# Altium PCB boost_converter.PcbDoc
Units mm, origin at the board's own origin, x right, y up, seen from the top; angles counter-clockwise.
Board outline 30.6 x 39.27 mm, 2 copper layers (Top Layer, Bottom Layer), stack 1.6 mm thick; 27 components, 16 nets, 72 pads, 24 vias.
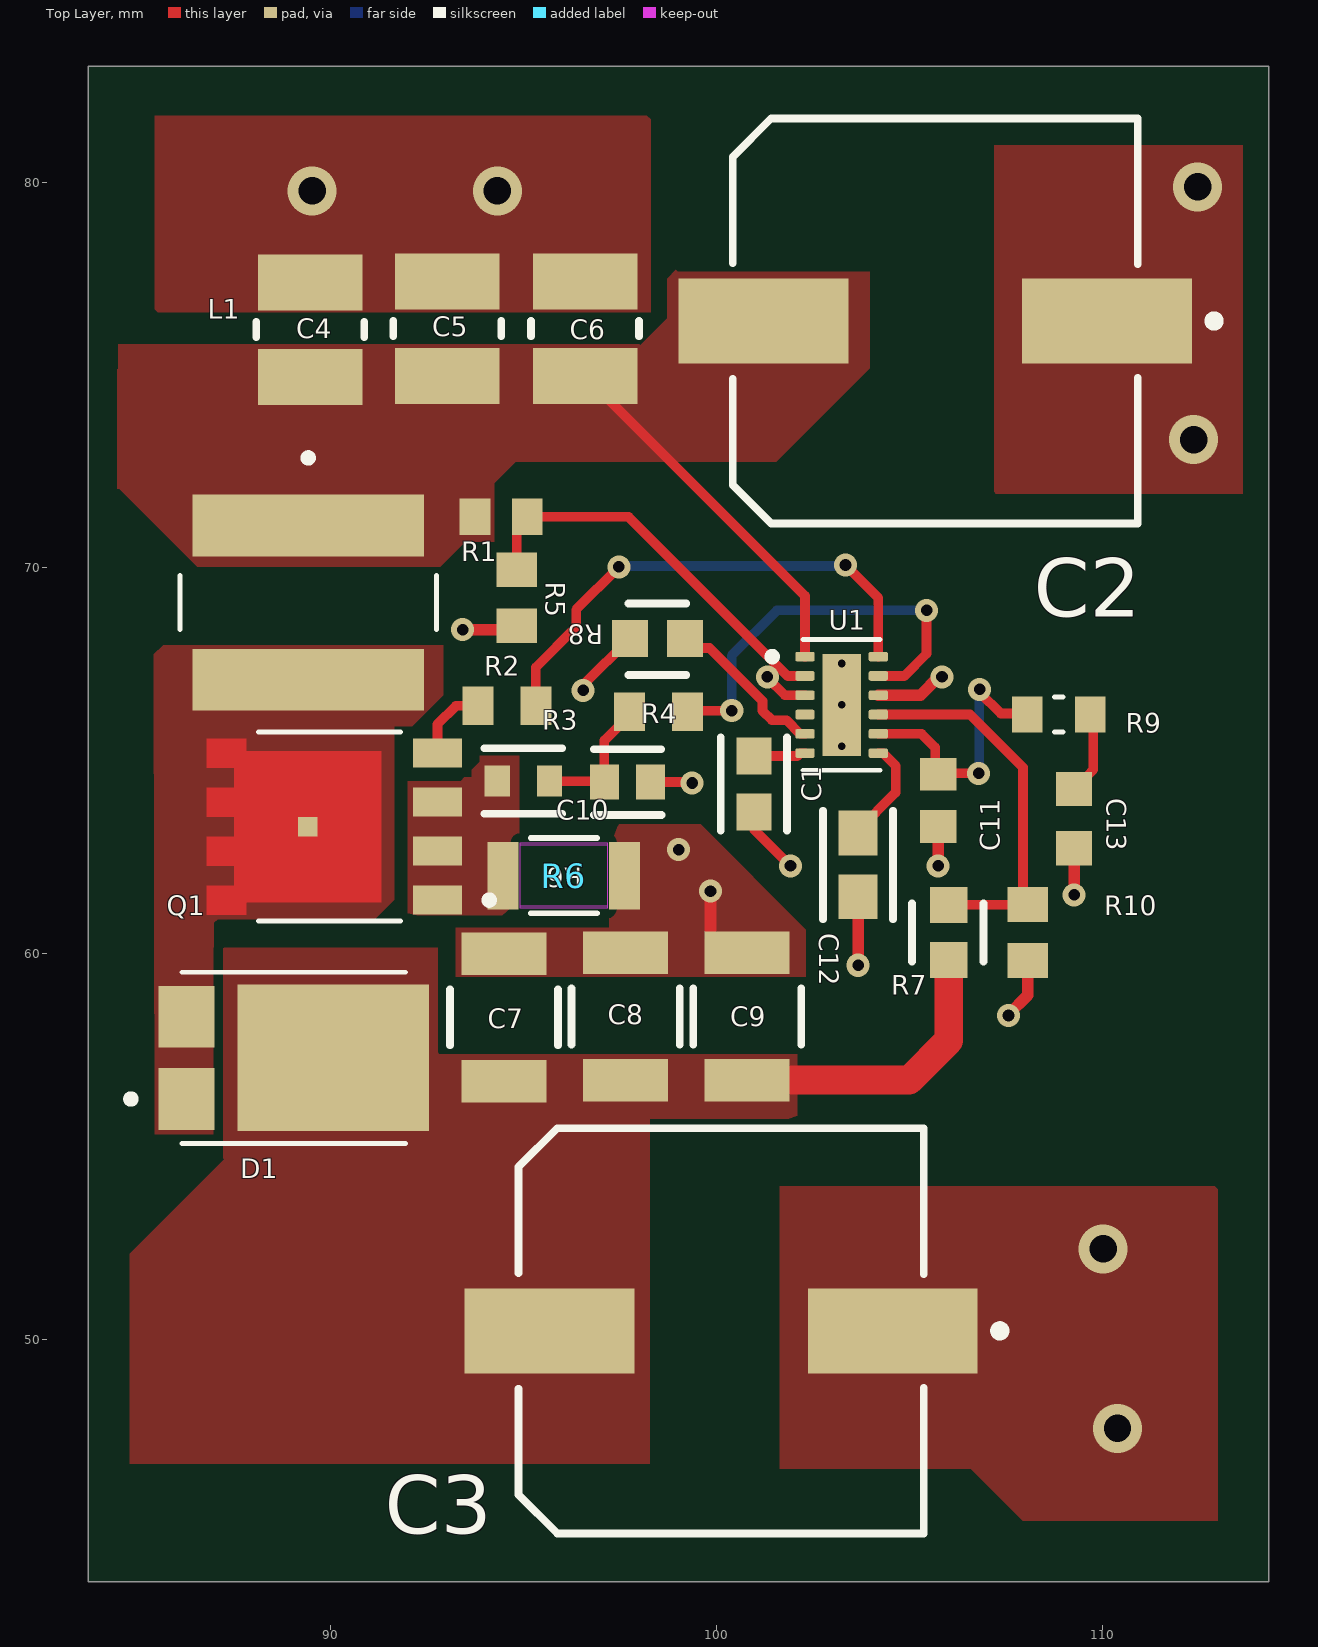
[diagram p0: Top Layer view]
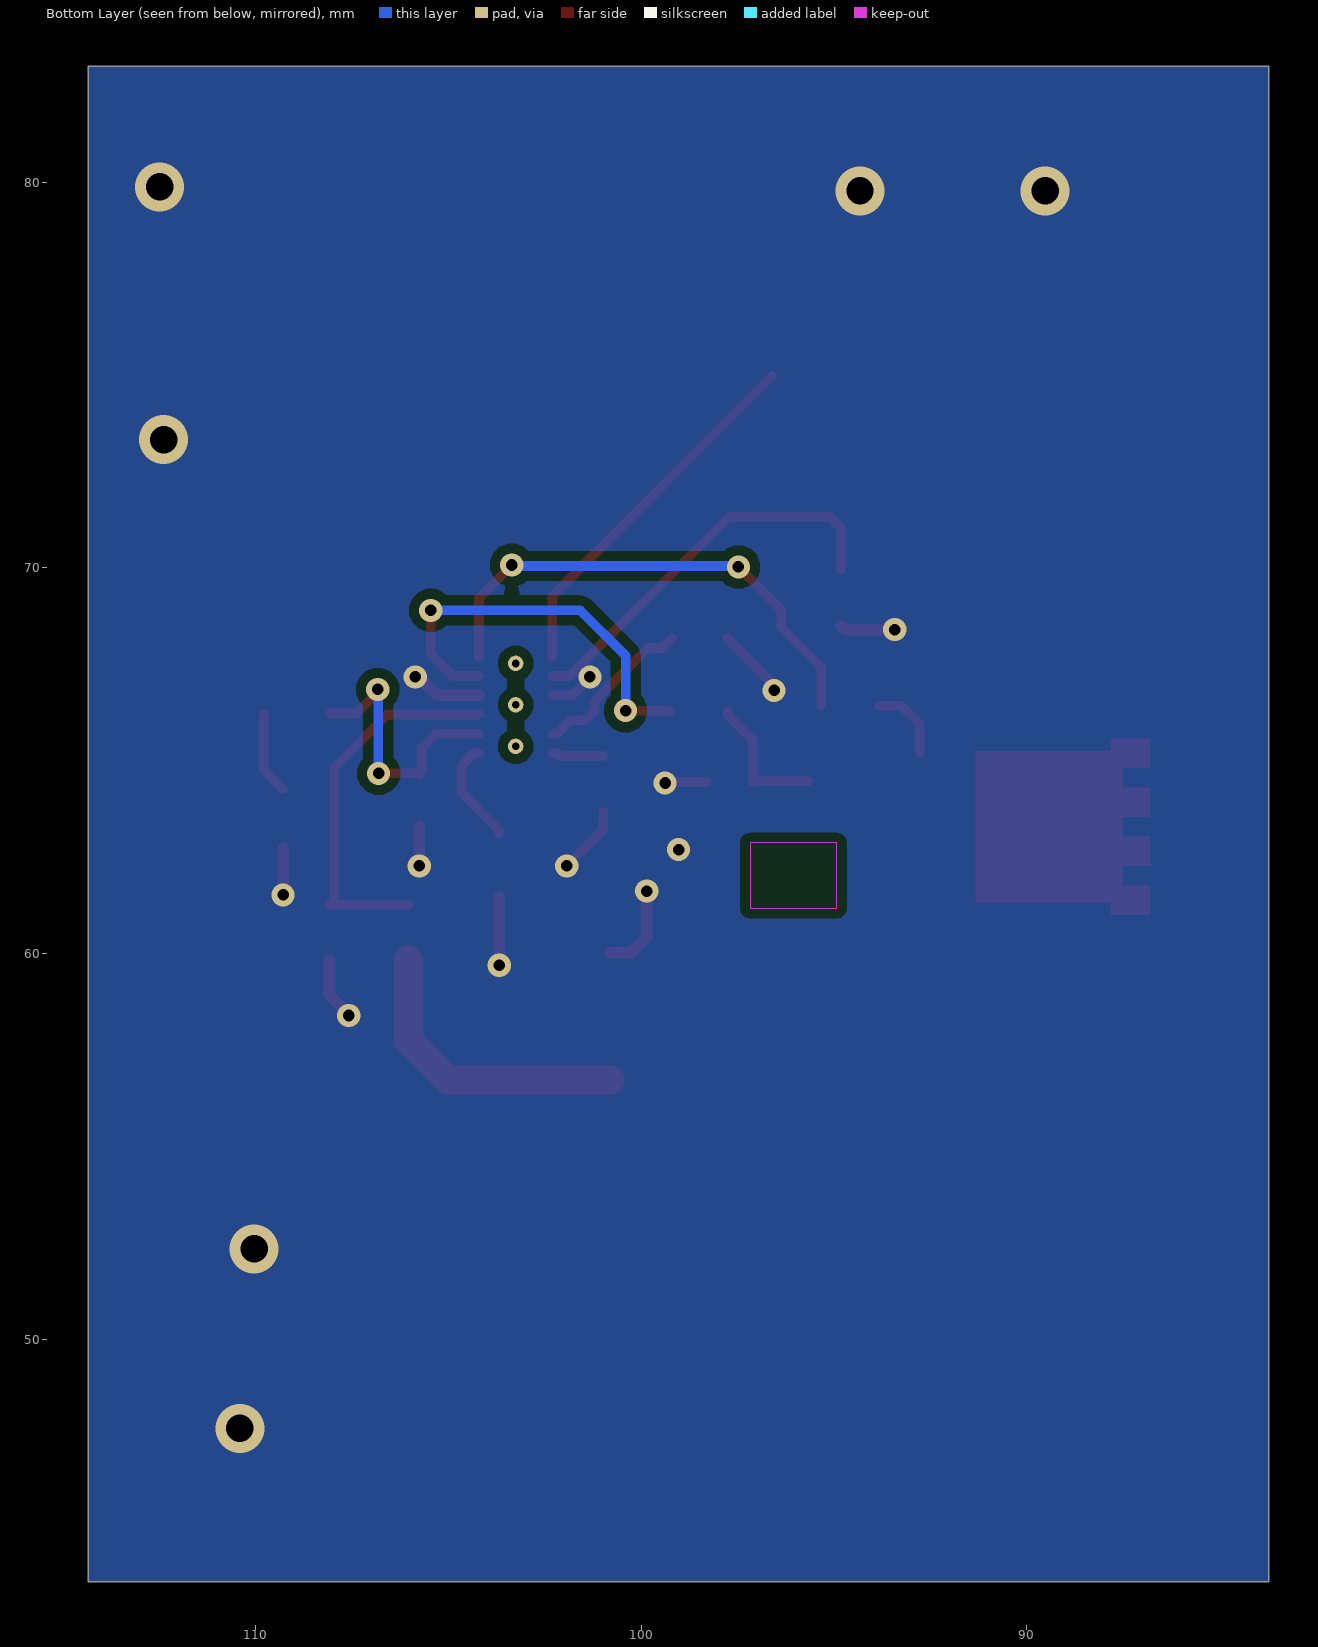
[diagram p1: Bottom Layer view, seen from below]
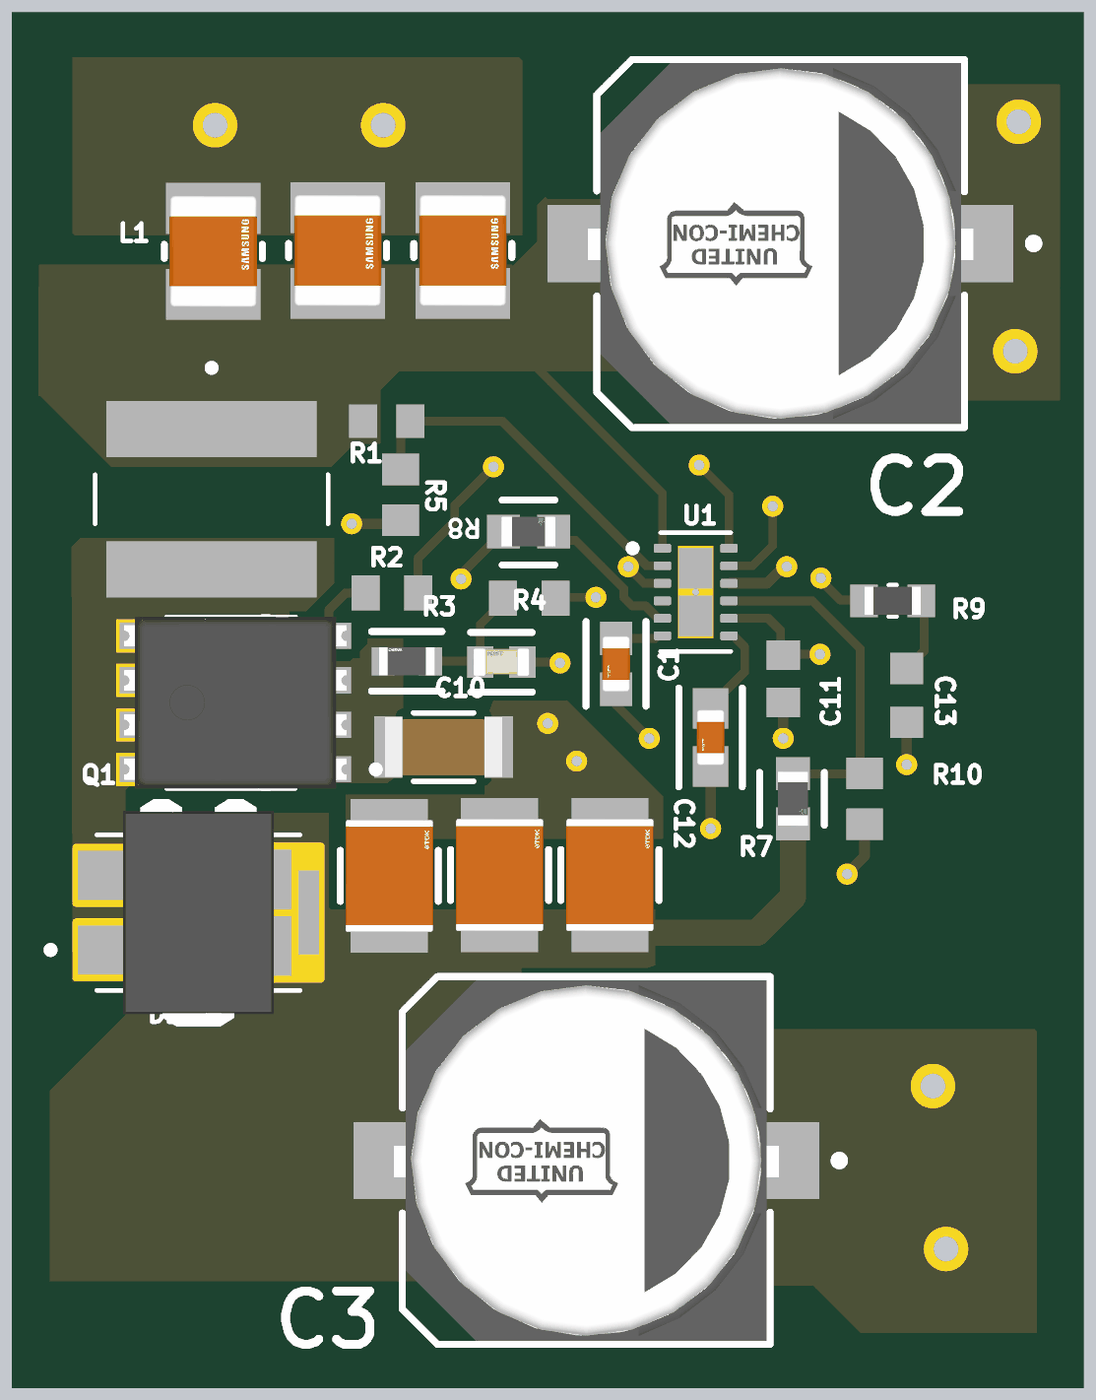
[diagram p2: 3D render of the assembled board from above, using the file's embedded part models]

## Layer stack, top to bottom
Top Solder: solder mask 0.0102, Solder Resist, Dk 3.5
Top Layer: signal copper 0.07
Dielectric 1: core 1.46, FR-4, Dk 4.8
Bottom Layer: signal copper 0.07
Bottom Solder: solder mask 0.0102, Solder Resist, Dk 3.5

## Board outline
83.725,83 114.325,83 114.325,43.725 83.725,43.725

## Design rules (kind name [scope] priority, off if disabled: settings)
Clearance [All] p1: gap=0.254 ignorepadtopadclearanceinfootprint=FALSE
PolygonConnect PolygonConnect_1 [InNet('GND')] p1: thpad.connectstyle=Relief thpad.reliefconductorwidth=0.254 thpad.reliefentries=4 thpad.polygonreliefangle="90 Angle" thpad.airgapwidth=0.254 smdpad.connectstyle=Direct smdpad.reliefconductorwidth=0.254 smdpad.reliefentries=4 smdpad.polygonreliefangle="90 Angle" smdpad.airgapwidth=0.254 via.connectstyle=Direct via.reliefconductorwidth=0.254 via.reliefentries=4 via.polygonreliefangle="90 Angle" via.airgapwidth=0.254
PolygonConnect NETQ1_1_Connect [InNet('NetQ1_1')] p2: thpad.connectstyle=Relief thpad.reliefconductorwidth=0.254 thpad.reliefentries=4 thpad.polygonreliefangle="90 Angle" thpad.airgapwidth=0.254 smdpad.connectstyle=Direct smdpad.reliefconductorwidth=0.254 smdpad.reliefentries=4 smdpad.polygonreliefangle="90 Angle" smdpad.airgapwidth=0.254 via.connectstyle=Direct via.reliefconductorwidth=0.254 via.reliefentries=4 via.polygonreliefangle="90 Angle" via.airgapwidth=0.254
PolygonConnect NETD1_1_Connect [InNet('NetD1_1')] p3: thpad.connectstyle=Relief thpad.reliefconductorwidth=0.254 thpad.reliefentries=4 thpad.polygonreliefangle="90 Angle" thpad.airgapwidth=0.254 smdpad.connectstyle=Direct smdpad.reliefconductorwidth=0.254 smdpad.reliefentries=4 smdpad.polygonreliefangle="90 Angle" smdpad.airgapwidth=0.254 via.connectstyle=Direct via.reliefconductorwidth=0.254 via.reliefentries=4 via.polygonreliefangle="90 Angle" via.airgapwidth=0.254
PolygonConnect [All vs InNetClass('PWR')] p4: connectstyle=Direct reliefconductorwidth=0.254 reliefentries=4 polygonreliefangle="90 Angle" airgapwidth=0.254
RoutingVias Power_Vias [InNetClass('PWR')] p1: holewidth=0.4 width=0.8 viastyle="Through Hole" minholewidth=0.3 minwidth=0.6 maxholewidth=0.5 maxwidth=1
RoutingVias Signal_Vias [All] p2: holewidth=0.3 width=0.6 viastyle="Through Hole" minholewidth=0.3 minwidth=0.6 maxholewidth=0.4 maxwidth=0.8
RoutingVias [All] p3: holewidth=0.3 width=0.6 viastyle="Through Hole" minholewidth=0.3 minwidth=0.6 maxholewidth=0.4 maxwidth=0.8
SolderMaskExpansion [All] p1: expansion=0 istentingtop=FALSE
SupplyNets "Schematic Supply Nets_3" [InNet('GND')] p1: voltage=0.000
SupplyNets "Schematic Supply Nets_2" [InNet('+24V_BOOST')] p2: voltage=0.000
SupplyNets "Schematic Supply Nets_1" [InNet('VCC')] p3: voltage=0.000
SupplyNets "Schematic Supply Nets" [InNet('VBAT_4S')] p4: voltage=0.000
Width Width_Signal [InNetClass('SIGNAL')] p1: maxlimit=1 minlimit=0.2 preferedwidth=0.25
Width Width_Power [InNetClass('PWR')] p2: maxlimit=10 minlimit=0.254 preferedwidth=1.75
Width [All] p3: maxlimit=0.3 minlimit=0.254 preferedwidth=0.254
30 further rules are at their usual default settings.

## Classes and differential pairs
net class SIGNAL: NetC10_1 NetC11_2 NetC12_1 NetC13_2 NetD1_1 NetQ1_1 NetQ1_4 NetR1_1 NetR2_1 NetR4_1 NetR7_1 NetR8_2 VCC
net class PWR: +24V_BOOST GND VBAT_4S

## Components (designator, comment, footprint, x,y, rotation, side; value= is the part's Value field where it differs from the comment)
C1 "C_vcc" FP-GCM188-0_1-IPC_B 100.975,64.4 r270 top
C2 "C_in" FP-HXC-ALA0-MFG 105.675,76.4 r180 top
C3 "C_out(bulk)" FP-HXC-ALA0-MFG 100.125,50.225 r180 top
C4 "CL32B106KBJNNNE" FP-CL32-IPC_C 89.475,76.175 r90 top
C5 "CL32B106KBJNNNE" FP-CL32-IPC_C 93.025,76.2 r90 top
C6 "CL32B106KBJNNNE" FP-CL32-IPC_C 96.6,76.2 r90 top
C7 "C_out" FP-C3225-250-0_4-MFG 94.5,58.35 r90 top
C8 "C_out" FP-C3225-250-0_4-MFG 97.65,58.375 r90 top
C9 "C_out" FP-C3225-250-0_4-MFG 100.8,58.375 r90 top
C10 "C_f" FP-C0603C-CF-MFG 97.7,64.45 r0 top value="100 pF"
C11 "C_hf" CAPC1608X90X35NL10T15 105.75,63.975 r90 top value=56pF
C12 "C_ss" FP-GCM188-0_1-IPC_A 103.675,62.3 r270 top
C13 "C_comp" *CAPC1608X90N 109.275,63.5 r90 top value=3.3nF
D1 "PMEG060V100EPDZ" DIO_PMEG060V100EPDZ 89.05,57.3 r0 top
L1 "Lm" *IND_CSEB0660H-150M 89.425,69.1 r270 top value=15uH
Q1 "TSM056NH04LCR_RLG" TRANS_TSM056NH04LCR_RLG 90.105,63.295 r180 top
R1 "R_uvlot" RESC1608X55X30NL15T15 94.425,71.325 r180 top value=24.3k
R2 "R_g" RESC1608X55X25ML10T15 94.575,66.425 r180 top
R3 "R_f" FP-AC0603-IPC_C 95,64.475 r180 top
R4 "RC0603JR-070RL" RESC1608X55X25ML10T15 98.5,66.275 r180 top
R5 "R_uvlob" RESC1608X55X30ML15T15 94.825,69.225 r90 top value=3.65k
R6 "30mR" R_s 96.05,62.025 r180 top value=30mΩ
R7 "CRCW060347K0FKEA" FP-CRCW0603-e3-IPC_B 106.025,60.55 r270 top
R8 "R_t" FP-CRCW0603-e3-IPC_B 98.475,68.175 r0 top
R9 "45.3kR" R_comp 108.875,66.2 r180 top
R10 "R_fbb" RESC1608X55X30ML15T15 108.075,60.55 r90 top value=2.05kR
U1 "LM5155DSST" IC_LM5155DSST 103.25,66.45 r0 top

## Footprints (in the part's own frame and the unit in brackets; to place one, negate y for a bottom-side part, rotate by r counter-clockwise, add the part's x,y. Pads: shape width x height; smd on the part's side, far side on the other; paste and mask are expansions set on the pad)
*CAPC1608X90N [mm]
  rect 0.89x0.93 smd: 1(-0.77,0) 2(0.77,0)
*IND_CSEB0660H-150M [mm]
  rect 1.6x6 smd: 1(-2,0) 2(2,0)
  silkscreen extent -3.85,-3.32 0.7,3.32
CAPC1608X90X35NL10T15 [mm] "Chip Capacitor, 2-Leads, Body 1.60x0.80mm, IPC Medium Density"
  rect 0.85x0.95 smd: 1(-0.675,0) 2(0.675,0)
  body extent -0.85,-0.45 0.85,0.45, height 0.9
DIO_PMEG060V100EPDZ [mm]
  rect 1.44x1.6 smd paste-2 mask+0.1: 1(-2.78,-1.065) 2(-2.78,1.065)
  rect 4.96x3.8 smd paste-3 mask+0.1: 3(1.02,0)
  silkscreen extent -4.32,-2.22 2.9,2.22, body extent -2.15,-3.25 2.15,3.25, height 0.82
FP-AC0603-IPC_C [mm]
  rect 0.659x0.812 smd paste+0 mask+0: 1(-0.677,0) 2(0.677,0)
  silkscreen extent -1.01,-0.85 1.01,0.85, body extent -1.11,-0.55 1.11,0.55, height 0.25
FP-C0603C-CF-MFG [mm]
  rect 0.75x0.9 smd paste+0 mask+0: 1(-0.6,0) 2(0.6,0)
  silkscreen extent -0.87,-0.85 0.88,0.85, body extent -1.2,-0.6 1.2,0.6, height 0.25
FP-C3225-250-0_4-MFG [mm]
  rect 1.1x2.2 smd paste+0 mask+0: 1(-1.65,0) 2(1.65,0)
  silkscreen extent -0.72,-1.4 0.72,1.4, body extent -2.3,-1.5 2.3,1.5, height 0.25
FP-CL32-IPC_C [mm]
  rect 1.453x2.704 smd paste+0 mask+0: 1(-1.225,0) 2(1.225,0)
  silkscreen extent -0.2,-1.4 0.2,1.4, body extent -2.05,-1.5 2.05,1.5, height 0.25
FP-CRCW0603-e3-IPC_B [mm]
  rect 0.935x0.962 smd paste+0 mask+0: 1(-0.715,0) 2(0.715,0)
  silkscreen extent -0.75,-0.95 0.75,0.9, body extent -1.43,-0.73 1.43,0.73, height 0.25
FP-GCM188-0_1-IPC_A [mm]
  rect 1.159x1.012 smd paste+0 mask+0: 1(-0.827,0) 2(0.827,0)
  silkscreen extent -1.41,-0.91 1.41,0.91, body extent -1.91,-1.01 1.91,1.01, height 0.25
FP-GCM188-0_1-IPC_B [mm]
  rect 0.959x0.912 smd paste+0 mask+0: 1(-0.727,0) 2(0.727,0)
  silkscreen extent -1.21,-0.86 1.21,0.86, body extent -1.46,-0.71 1.46,0.71, height 0.25
FP-HXC-ALA0-MFG [mm]
  rect 4.4x2.2 smd paste+0 mask+0: 1(-4.45,0) 2(4.45,0)
  silkscreen extent -7.35,-5.25 5.25,5.25, body extent -6.9,-5.5 6.9,5.5, height 0.25
IC_LM5155DSST [mm]
  rrect40% 0.5x0.25 smd: 1(-0.95,1.25) 2(-0.95,0.75) 3(-0.95,0.25) 4(-0.95,-0.25) 5(-0.95,-0.75) 6(-0.95,-1.25) 7(0.95,-1.25) 8(0.95,-0.75) 9(0.95,-0.25) 10(0.95,0.25) 11(0.95,0.75) 12(0.95,1.25)
  rect 1x2.65 smd paste-2: 13(0,0)
  round 0.4 hole 0.2 mask+0: 14(0,1.075) 15(0,0) 16(0,-1.075)
  silkscreen extent -1.9,-1.7 1,1.7
R_comp [mm]
  rect 0.79x0.93 smd: 1(-0.82,0) 2(0.82,0)
  silkscreen extent -0.11,-0.45 0.11,0.45, body extent -0.8,-0.4 0.8,0.4, height 0.55
R_s [mm]
  rect 0.805x1.751 smd paste+0 mask+0: 1(-1.577,0) 2(1.577,0)
  Top Layer keep-out region: -1.124,-0.799 -1.124,0.799 1.124,0.799 1.124,-0.799
  Keep-Out Layer region: -1.124,-0.85 -1.124,0.85 1.124,0.85 1.124,-0.85
  silkscreen extent -0.86,-0.98 0.86,0.98, body extent -1.68,-0.85 1.68,0.85, height 0.55
RESC1608X55X25ML10T15 [mm] "Chip Resistor, 2-Leads, Body 1.60x0.80mm, IPC Low Density"
  rect 0.8x1 smd: 1(-0.75,0) 2(0.75,0)
  body extent -0.85,-0.45 0.85,0.45, height 0.55
RESC1608X55X30ML15T15 [mm] "Chip Resistor, 2-Leads, Body 1.60x0.80mm, IPC Low Density"
  rect 0.9x1.05 smd: 1(-0.725,0) 2(0.725,0)
  body extent -0.87,-0.48 0.87,0.48, height 0.55
RESC1608X55X30NL15T15 [mm] "Chip Resistor, 2-Leads, Body 1.60x0.80mm, IPC Medium Density"
  rect 0.8x0.95 smd: 1(-0.675,0) 2(0.675,0)
  body extent -0.87,-0.48 0.87,0.48, height 0.55
TRANS_TSM056NH04LCR_RLG [mm]
  rect 1.27x0.75 smd: 1(-2.67,1.905) 2(-2.67,0.635) 3(-2.67,-0.635) 4(-2.67,-1.905)
  rect 0.5x0.5 smd paste-1 mask+0: 5_8(0.69,0)
  Top Layer region: 3.305,1.53 2.595,1.53 2.595,1.01 3.305,1.01 3.305,0.26 2.595,0.26 2.595,-0.26 3.305,-0.26 3.305,-1.01 2.595,-1.01 2.595,-1.53 3.305,-1.53 3.305,-2.28 2.285,-2.28 2.285,-1.955 -1.215,-1.955 -1.215,1.955 2.285,1.955 2.285,2.28 3.305,2.28
  silkscreen extent -4.11,-2.45 1.96,2.45, body extent -3.18,-2.52 3.18,2.52, height 1.1

## Part data
C1: library part CMP-2006-02357-2, "Ceramic Capacitor for Automotive 1uF  ±10% 16VDC X7R 0603 Paper T/R", Capacitance=1uF, Case Code (Imperial)=0603, Case Code (Metric)=1608, Dielectric=X7R, Max Operating Temperature=125°C, Min Operating Temperature=-55°C, Package Quantity=1, Ratings=AEC-Q200, Tolerance=10%, Voltage=16V, Case/Package=0603, Depth=0.8mm, Height=0.8mm, Lead Free="Lead Free", Length=1.6mm, Mount="Surface Mount", Packaging="Tape and Reel", Radiation Hardening=No, REACH SVHC="No SVHC", Termination=SMD/SMT, Thickness=0.035inch, Voltage Rating=16V, Voltage Rating (DC)=16V, Width=0.031inch
C2 C3: library part CMP-33769-000007-1, "CAP ALUM POLY 100UF 20% 50V SMD", Capacitance=100uF, Case/Package=Radial, ESR (Equivalent Series Resistance)=25mR, Max Operating Temperature=125°C, Min Operating Temperature=-55°C, Ratings=AEC-Q200, Resistor Type=Hybrid, Tolerance=20%, Voltage Rating=50V, Life (Hours)=4000Hour, Mount="Surface Mount", Packaging="Cut Tape", RoHS Compliant=Yes
C4 C5 C6: library part CMP-2000-06110-2, "Cap Ceramic 10uF 50V X7R ±10% SMD 1210 +125°C Embossed T/R", Capacitance=10uF, Case Code (Imperial)=1210, Case Code (Metric)=3225, Dielectric=X7R, Max Operating Temperature=125°C, Min Operating Temperature=-55°C, Package Quantity=1, Tolerance=10%, Voltage=50V, Case/Package=1210, Depth=2.5mm, Height=2.5mm, Lead Free="Lead Free", Length=3.2mm, Material=Ceramic, Mount="Surface Mount", Packaging="Tape and Reel", Radiation Hardening=No, Thickness=0.106inch, Voltage Rating=50V, Voltage Rating (DC)=50V, Width=0.098inch
C7 C8 C9: library part CMP-08246-004459-1, "Multilayer Ceramic Capacitors 4.7uF ±10% 50V X7R SMD 1210", Capacitance=4.7uF, Case Code (Imperial)=1210, Case Code (Metric)=3225, Dielectric=X7R, Dielectric Material=Ceramic, Max Operating Temperature=125°C, Min Operating Temperature=-55°C, Package Quantity=1000, Tolerance=10%, Voltage Rating=50V, Case/Package=1210, Construction=Flat, Depth=2.5mm, Height=2.5mm, Lead Free="Lead Free", Length=3.2mm, Mount="Surface Mount", Number of Pins=2, Packaging="Tape and Reel", Radiation Hardening=No, REACH SVHC="No SVHC", Resistor Type=Ceramic, RoHS Compliant=Yes, Series=C, Termination=SMD/SMT, Thickness=0.11inch, Voltage Rating (DC)=50V, Weight=0.000564oz, Width=0.098inch
C10: library part CMP-2006-03418-2, "CAP CER 100PF 50V 1% NP0 0603", Capacitance="100 pF", Manufacturer=KEMET, Manufacturer Part Number=C0603C101F5GACTU, Package=C0603C-CF, Temperature="-55°C to +125°C", Temperature Characteristic=C0G, Temperature Coefficient=30ppm/°C, Temperature Range High=+125°C, Temperature Range Low=-55°C, Tolerance=0.01, Voltage Rating="50 V", Automotive=Yes, Automotive Grade="Grade 1", Category=Cap, ComponentLink2Description=Datasheet, ComponentLink2URL=https://api.kemet.com/component-edge/download/datasheet/C0603C100J5GACAUTO.pdf, Device Class L1="Passive Components", Device Class L2=Capacitors, Device Class L3="Ceramic Capacitors", Digikey Description="CAP CER 100PF 50V 1% NP0 0603", Height=0.87mm, Lead Free=Yes, Material=Ceramic, Mouser Description="Multilayer Ceramic Capacitors MLCC - SMD/SMT 50volts 100pF C0G 1%", Octopart=https://octopart.com/c0603c101f5gactu-kemet-8293493, RoHS=TRUE
C11: library part CMP-2006-02680-1, "CAP CER 56PF 50V C0G/NP0 0603", Manufacturer=Murata, Part Number=GRM1885C1H560JA01D
C12: library part CMP-2006-02383-2, "Ceramic Capacitor for Automotive 220nF  ±10% 50VDC X7R 0603 Paper T/R", Capacitance=220nF, Case Code (Imperial)=0603, Case Code (Metric)=1608, Dielectric=X7R, Max Operating Temperature=125°C, Min Operating Temperature=-55°C, Package Quantity=10, Ratings=AEC-Q200, Tolerance=10%, Voltage=50V, Case/Package=0603, Depth=0.8mm, Height=0.8mm, Lead Free="Lead Free", Length=1.6mm, Mount="Surface Mount", Packaging="Tape and Reel", Radiation Hardening=No, REACH SVHC="No SVHC", Termination=SMD/SMT, Thickness=0.035inch, Voltage Rating=50V, Voltage Rating (DC)=50V, Width=0.031inch
C13: library part GRM188R72A332KA01J, "CAP CER 3300PF 100V X7R 0603", SOURCE_URL=https://www.snapeda.com/parts/GRM188R72A332KA01J/Murata/view-part/?ref=snap
D1: "Diode Schottky 60 V 10A Surface Mount CFP15", Package="CFP15-3 Nexperia USA Inc.", Check_prices=https://www.snapeda.com/parts/PMEG060V100EPDZ/Nexperia/view-part/?ref=eda, MF="Nexperia USA", MP=PMEG060V100EPDZ, SnapEDA_Link=https://www.snapeda.com/parts/PMEG060V100EPDZ/Nexperia/view-part/?ref=snap
L1: library part CSEB0660H-150M, "FIXED IND 15UH 6A 43.8 MOHM SMD", Manufacturer=Codaca, MAXIMUM_PACKAGE_HEIGHT=6.10mm, PARTREV=09/15/2025, SOURCE_URL=https://www.snapeda.com/parts/CSEB0660H-150M/Codaca/view-part/?ref=snap, STANDARD="Manufacturer Recommendations", UNIT=mm
Q1: "N-Channel Power Î©SFET 40V, 54A, 5.6mÎ©", Package="NON-STANDARD-5 Taiwan Semiconductor", Check_prices=https://www.snapeda.com/parts/TSM056NH04LCR%20RLG/taiwan/view-part/?ref=eda, MF="Taiwan Semiconductor", MP="TSM056NH04LCR RLG", SnapEDA_Link=https://www.snapeda.com/parts/TSM056NH04LCR%20RLG/taiwan/view-part/?ref=snap
R1: library part CMP-2000-00366-1, "RES SMD 24.3K OHM 1% 1/10W 0603", Manufacturer=Panasonic, Part Number=ERJ-3EKF2432V
R2 R4: library part CMP-2100-03667-1, "Chip Resistor, 0 Ohm, +/- 5%, 0.1 W, -55 to 155 degC, 0603 (1608 Metric), RoHS, Tape and Reel", Case Code (Imperial)=0603, Case Code (Metric)=1608, Manufacturer=Yageo, Max Operating Temperature=155degC, Min Operating Temperature=-55degC, Package Description="2-Pin Surface Mount Device, Body 1.6 x 0.8 mm", Package Quantity=5000, Power Rating=100mW, Resistance=0, Temperature Coefficient=200ppm/degreesC, Tolerance=5%, Voltage Rating=50V, Case/Package=0603, Composition=ThickFilm, Contact Plating=Tin, Datasheet URL=http://www.yageo.com/NewPortal/yageodocoutput?fileName=/pdf/R-Chip/PYu-RC_Group_51_RoHS_L_5.pdf, Datasheet Version="Rev. 5, 10/2016", Depth=0.8mm, Height=0.45mm, Lead Free=LeadFree, Length=1.6mm, Manufacturer URL=http://www.yageo.com/, Military Standard=Not, Number of Pins=2, Package Reference=0603, Packaging=TapeandReel, Radiation Hardening=No, REACH SVHC=NoSVHC, RoHSCompliant=true, Termination=SMD/SMT, Voltage Rating (DC)=50V, Width=0.8mm
R3: library part CMP-2000-04817-3, "RES 100Ω 1.00% 0.1W 0603", Case Code (Imperial)=0603, Case Code (Metric)=1608, Max Operating Temperature=155°C, Max Power Dissipation=100mW, Min Operating Temperature=-55°C, Ratings=AEC-Q200, Resistance=100R, Resistor Type="Thick Film", Temperature Coefficient=100ppm/°C, Tolerance=1%, Voltage Rating=50V, Case/Package=0603, Construction=Rectangular, Contact Plating=Tin, Depth=0.8mm, Features="Moisture Resistant", Height=0.45mm, Lead Free="Lead Free", Length=1.6mm, Military Standard=Not, Number of Terminations=2, Packaging="Tape and Reel", Power Rating=100mW, Radiation Hardening=No, RoHS Compliant=Yes, Series=AC, Size Code=0603, Termination=SMD/SMT, Weight=7.1E-05oz, Width=0.8mm
R5: library part CMP-2000-00462-1, "RES SMD 3.65K OHM 1% 1/10W 0603", Manufacturer=Panasonic, Part Number=ERJ-3EKF3651V
R6: library part CRA2512-FZ-R030ELF, "RES 0.03 OHM 1% 1W 1206", Case Code (Imperial)=2512, Case Code (Metric)=6432, Manufacturer=Bourns, Max Operating Temperature=170°C, Max Power Dissipation=3W, Min Operating Temperature=-55°C, Ratings=AEC-Q200, Temperature Coefficient=50ppm/°C, Tolerance=1%, Case/Package=2512, Category="Chip SMD Resistors", China RoHS=Compliant, ComponentLink1Description=https://datasheet.octopart.com:443/CRA2512-FZ-R030ELF-Bourns-datasheet-169407838.pdf?src-supplier=IHS, ComponentLink1URL=https://datasheet.octopart.com:443/CRA2512-FZ-R030ELF-Bourns-datasheet-169407838.pdf?src-supplier=IHS, ComponentLink2Description=https://datasheet.octopart.com:443/CRA2512-FZ-R030ELF-Bourns-datasheet-68301994.pdf?src-supplier=Burklin+Elektronik, ComponentLink2URL=https://datasheet.octopart.com:443/CRA2512-FZ-R030ELF-Bourns-datasheet-68301994.pdf?src-supplier=Burklin+Elektronik, ComponentLink3Description=https://datasheet.octopart.com:443/CRA2512-FZ-R030ELF-Bourns-datasheet-32543139.pdf?src-supplier=element14+APAC, ComponentLink3URL=https://datasheet.octopart.com:443/CRA2512-FZ-R030ELF-Bourns-datasheet-32543139.pdf?src-supplier=element14+APAC, ComponentLink4Description=https://datasheet.octopart.com:443/CRA2512-FZ-R030ELF-Bourns-datasheet-15983344.pdf?src-supplier=element14+APAC, ComponentLink4URL=https://datasheet.octopart.com:443/CRA2512-FZ-R030ELF-Bourns-datasheet-15983344.pdf?src-supplier=element14+APAC, ComponentLink5Description=https://datasheet.octopart.com:443/CRA2512-FZ-R030ELF-Bourns-datasheet-26822206.pdf?src-supplier=Farnell, ComponentLink5URL=https://datasheet.octopart.com:443/CRA2512-FZ-R030ELF-Bourns-datasheet-26822206.pdf?src-supplier=Farnell, ComponentLink6Description=https://datasheet.octopart.com:443/CRA2512-FZ-R030ELF-Bourns-datasheet-21630808.pdf?src-supplier=Farnell, ComponentLink6URL=https://datasheet.octopart.com:443/CRA2512-FZ-R030ELF-Bourns-datasheet-21630808.pdf?src-supplier=Farnell, ComponentLink7Description=https://datasheet.octopart.com:443/CRA2512-FZ-R030ELF-Bourns-datasheet-154729667.pdf?src-supplier=Electro+Sonic, ComponentLink7URL=https://datasheet.octopart.com:443/CRA2512-FZ-R030ELF-Bourns-datasheet-154729667.pdf?src-supplier=Electro+Sonic, ComponentLink8Description=https://datasheet.octopart.com:443/CRA2512-FZ-R030ELF-Bourns-datasheet-8519302.pdf?src-supplier=RS+(Formerly+Allied+Electronics), ComponentLink8URL=https://datasheet.octopart.com:443/CRA2512-FZ-R030ELF-Bourns-datasheet-8519302.pdf?src-supplier=RS+(Formerly+Allied+Electronics), ComponentLink9Description=https://datasheet.octopart.com:443/CRA2512-FZ-R030ELF-Bourns-datasheet-57227053.pdf?src-supplier=RS+(Formerly+Allied+Electronics), ComponentLink9URL=https://datasheet.octopart.com:443/CRA2512-FZ-R030ELF-Bourns-datasheet-57227053.pdf?src-supplier=RS+(Formerly+Allied+Electronics), ComponentLink10Description=https://datasheet.octopart.com:443/CRA2512-FZ-R030ELF-Bourns-datasheet-190051968.pdf?src-supplier=Newark, ComponentLink10URL=https://datasheet.octopart.com:443/CRA2512-FZ-R030ELF-Bourns-datasheet-190051968.pdf?src-supplier=Newark, ComponentLink11Description=https://datasheet.octopart.com:443/CRA2512-FZ-R030ELF-Bourns-datasheet-10633406.pdf?src-supplier=element14, ComponentLink11URL=https://datasheet.octopart.com:443/CRA2512-FZ-R030ELF-Bourns-datasheet-10633406.pdf?src-supplier=element14, ComponentLink12Description=http://sigma.octopart.com:80/conflict_mineral_statement/Bourns-company-36.pdf?src-supplier=Compliance+Statements, ComponentLink12URL=http://sigma.octopart.com:80/conflict_mineral_statement/Bourns-company-36.pdf?src-supplier=Compliance+Statements, Composition="Metal Alloy, Metal Strip", Contact Plating=Tin, Country of Origin=Taiwan, Depth=3.2mm, Export Control Classification Number (ECCN) Code=EAR99, Features="Moisture Resistant", Harmonized Tariff Schedule (HTS) Code=8533.21.00.30, Height=700µm, Introduction Date=2008-05-23, Length=6.4mm, Lifecycle Status=Production, Manufacturer Part Number=CRA2512-FZ-R030ELF, Military Standard=Not, Mounting Technology="Surface Mount", Number of Terminals=2, Number of Terminations=2, Packaging="Tape & Reel", Pins=2, Power Rating=3W, Pricing="4000=0.20541, 8000=0.20133, 16000=0.1974, 32000=0.19363, 64000=0.12768 (USD)", Radiation Hardening=No, REACH SVHC=Unaffected, RoHS=Compliant, Schedule B="8533210025, 8533290000, 8533290000|8533290000|8533290000|8533290000|8533290000|8533290000|8533290000|8533290000, 8533290000|8533290000|8533290000|8533290000|8533290000|8533290000|8533290000|8533290000|8533290000", Stock=28000, Supplier=Avnet, Supplier Part Number=CRA2512-FZ-R030ELF, Termination=SMD/SMT, Weight=40.511469mg, Width=3.2mm
R7: library part CMP-2000-03379-3, "RES SMD 47K OHM 1% 1/10W 0603", Case Code (Imperial)=0603, Case Code (Metric)=1608, Max Operating Temperature=155°C, Max Power Dissipation=100mW, Min Operating Temperature=-55°C, Package Quantity=5000, Resistance=47kR, Resistance Tolerance=1%, Resistor Type="Thick Film", Temperature Coefficient=100ppm/°C, Voltage Rating=75V, Case/Package=0603, Construction=Rectangular, Contact Plating=Tin, Depth=0.85mm, Features="Automotive AEC-Q200", Height=0.45mm, Lead Free="Lead Free", Length=1.55mm, Military Standard=Not, Mount="Surface Mount", Number of Terminations=2, Packaging="Tape and Reel", Power Rating=100mW, Radiation Hardening=No, RoHS Compliant=Yes, Series=CRCW, Size Code=0603, Technology="THICK FILM", Termination=SMD/SMT, Tolerance=1%, Voltage Rating (DC)=75V, Weight=7.1E-05oz, Width=0.85mm
R8: library part CMP-1012-00702-8, "RES Thick Film, 49.9kΩ, 1%, 0.1W, 100ppm/°C, 0603", Case Code (Imperial)=0603, Case Code (Metric)=1608, Max Operating Temperature=155°C, Max Power Dissipation=100mW, Min Operating Temperature=-55°C, Package Quantity=10, Resistance=49.9kR, Temperature Coefficient=100ppm/°C, Tolerance=1%, Voltage Rating=75V, Case/Package=0603, Composition="Thick Film", Contact Plating=Tin, Depth=0.85mm, Features="Automotive AEC-Q200", Height=0.45mm, Lead Free="Lead Free", Length=1.55mm, Military Standard=Not, Mount="Surface Mount", Number of Terminations=2, Packaging="Tape and Reel", Power Rating=100mW, Termination=SMD/SMT, Voltage Rating (DC)=75V, Weight=7.1E-05oz, Width=0.033inch, Working Voltage=75V
R9: library part ERJ3EKF4532V, "45.3 kOhms Â±1% 0.1W, 1/10W Chip Resistor 0603 (1608 Metric) Automotive AEC-Q200 Thick Film", Package="1608-2 Panasonic", Check_prices=https://www.snapeda.com/parts/ERJ3EKF4532V/Panasonic/view-part/?ref=eda, MF=Panasonic, MP=ERJ3EKF4532V, SnapEDA_Link=https://www.snapeda.com/parts/ERJ3EKF4532V/Panasonic/view-part/?ref=snap
R10: library part CMP-2000-00322-1, "RES SMD 2.05K OHM 1% 1/10W 0603", Manufacturer=Panasonic, Part Number=ERJ-3EKF2051V
U1: library part LM5155DSST_1, Package=None, Availability=Unavailable, MF="{'manufacturer': u'Texas Instruments'}", MP=LM5155DSST, Price=None

## Via types
v1: diameter 0.6, hole 0.3, Top Layer to Bottom Layer, 18 vias
v2: diameter 1.27, hole 0.711, Top Layer to Bottom Layer, 6 vias

## Nets (pads, with @x,y where several pads share a name; then routed paths per layer and width w, separated by ;. In a path a pad name is that pad's centre, name@x,y a point inside that pad or via, vN(x,y) a via of type N, cw(c..) or ccw(c..) an arc to the next point about the centre after c; other vN are vias at no path point)
+24V_BOOST: C3.2 C7.1 C8.1 C9.1 D1.3 R7.2 | length 7.7
  Top Layer w0.75: C9.1 105,56.725 106.025,57.75 R7.2
GND: C1.2 C2.1 C3.1 C4.2 C5.2 C6.2 C7.2 C8.2 C9.2 C10.2 C11.1 C12.2 C13.1 R5.1 R6.1 R8.1 R10.1 U1.3 U1.10 | length 17.2
  Top Layer w0.25: v1(96.55,66.825) 96.55,66.965 R8.1 ; C10.2 99.35,64.45 v1(99.375,64.425) ; C1.2 100.975,63.225 v1(101.925,62.275) ; v1(101.325,67.175) 101.325,67.15 101.775,66.7 U1.3
  Top Layer w0.3: v1(93.425,68.4) 94.725,68.4 R5.1 ; v1(99.85,61.625) 99.85,60.425 100.25,60.025 C9.2 ; v1(103.675,59.7) C12.2 ; U1.10 105.294,66.7 105.769,67.175 v1(105.85,67.175) ; v1(105.75,62.275) C11.1 ; v1(107.575,58.4) 107.575,58.425 108.075,58.925 R10.1 ; v1(109.275,61.525) C13.1
  other v1: 99.025,62.7
  other v2: 110.4,47.7 110.025,52.35 112.375,73.325 89.525,79.775 94.325,79.775 112.475,79.875
NetC10_1: C10.1 R3.1 R4.2 | length 3.5
  Top Layer w0.25: R3.1 97.075,64.475 C10.1 97.1,65.525 97.75,66.175 R4.2
NetC11_2: C11.2 R9.2 U1.8 | length 7.1
  Top Layer w0.25: U1.8 105.325,65.7 105.675,65.35 105.675,64.725 C11.2 105.775,64.675 v1(106.8,64.675) ; v1(106.825,66.85) 106.825,66.775 107.375,66.225 R9.2@108.055,66.225
  Bottom Layer w0.25: v1(106.8,64.675) 106.812,64.687 106.812,66.837 v1(106.825,66.85)
NetC12_1: C12.1 U1.7 | length 2.7
  Top Layer w0.25: C12.1 103.675,63.2 104.65,64.175 104.65,64.875 104.325,65.2 U1.7
NetC13_2: C13.2 R9.1 | length 2.1
  Top Layer w0.25: C13.2 109.295,64.27 109.615,64.59 109.615,64.61 109.775,64.77 R9.1@109.775,66.2
NetD1_1: D1.1 D1.2 L1.2 Q1.5_8
NetQ1_1: Q1.1 Q1.2 Q1.3 R3.2 R6.2
NetQ1_4: Q1.4 R2.2 | length 2
  Top Layer w0.25: Q1.4 92.775,65.95 93.25,66.425 R2.2
NetR1_1: R1.1 R5.2 U1.2 | length 10.4
  Top Layer w0.25: R5.2 94.825,71.05 R1.1 97.727,71.325 101.852,67.2 U1.2
NetR2_1: R2.1 U1.12 | length 13.1
  Top Layer w0.25: R2.1 95.325,67.425 96.367,68.467 96.367,68.917 v1(97.475,70.025) ; v1(103.35,70.075) 104.2,69.225 U1.12
  Bottom Layer w0.25: v1(97.475,70.025) 97.5,70.05 103.325,70.05 v1(103.35,70.075)
NetR4_1: R4.1 U1.11 | length 10.7
  Top Layer w0.25: R4.1 99.275,66.3 v1(100.4,66.3) ; U1.11 104.875,67.2 105.45,67.775 v1(105.45,68.9)
  Bottom Layer w0.25: v1(100.4,66.3) 100.4,67.725 101.575,68.9 v1(105.45,68.9)
NetR7_1: R7.1 R10.2 U1.9 | length 10
  Top Layer w0.25: U1.9 106.575,66.2 107.95,64.825 107.95,61.4 R10.2 108.065,61.265 R7.1
NetR8_2: R8.2 U1.5 | length 4.3
  Top Layer w0.25: R8.2 99.44,67.925 99.825,67.925 101.2,66.55 101.2,66.296 101.443,66.054 101.821,66.054 102.175,65.7 U1.5
VBAT_4S: C2.2 C4.1 C5.1 C6.1 L1.1 R1.2 U1.1 | length 9.6
  Top Layer w0.25: C6.1 102.3,69.275 U1.1
VCC: C1.1 U1.6 | length 1.4
  Top Layer w0.25: C1.1 102.102,65.127 102.175,65.2 U1.6
pads on no net: U1.4 U1.13 U1.14 U1.15 U1.16

## Polygon pours and split planes (outlines as drawn)
GND on Top Layer "GND_L01_P025" (solid, pour order 25): 107.2,80.95 107.2,71.975 107.25,71.925 113.65,71.925 113.65,80.925 113.675,80.95 107.275,80.95
GND on Top Layer "GND_L01_P024" (solid, pour order 24): 85.45,81.725 85.45,76.7 85.525,76.625 98.3,76.625 98.3,81.625 98.2,81.725 85.425,81.725
GND on Top Layer "GND_L01_P023" (solid, pour order 23): 101.65,53.975 101.65,46.65 106.6,46.65 107.95,45.3 113,45.3 113,53.9 112.925,53.975
VBAT_4S on Top Layer "VBAT_4S_L01_P022" (solid, pour order 22): 84.475,75.55 84.475,72.05 84.525,72.05 86.55,70.025 92.85,70.025 93.5,70.675 94.25,70.675 94.25,72.2 94.8,72.75 101.55,72.75 103.975,75.175 103.975,77.675 99,77.675 98.95,77.725 98.725,77.5 98.725,76.475 98.025,75.775 98,75.8 84.5,75.8 84.5,75.15
NetQ1_1 on Top Layer "NETQ1_1_L01_P021" (solid, pour order 21): 91.975,61 94.9,61 94.9,65.1 94.925,65.125 93.875,65.125 93.875,64.975 93.375,64.475 92,64.475 92,61.05 91.975,61.025
NetD1_1 on Top Layer "NETD1_1_L01_P020" (solid, pour order 20): 86.975,55.325 86.975,60.8 87.075,60.9 91.15,60.9 91.65,61.4 91.65,65.9 92.125,65.9 92.925,66.7 92.925,68 85.45,68 85.425,67.975 85.451,55.325
+24V_BOOST on Top Layer "+24V_BOOST_L01_P019" (solid, pour order 19): 87.225,60.175 87.225,54.7 87.25,54.675 84.8,52.225 84.8,46.775 98.25,46.775 98.275,46.75 98.275,55.725 102.075,55.725 102.125,55.775 102.1,55.8 102.1,57.4 92.825,57.4 92.775,57.45 92.775,60.15 87.25,60.15
GND on Top Layer "GND_L01_P018" (solid, pour order 18): 93.25,60.675 97.225,60.675 97.2,63.35 99.6,63.35 102.325,60.625 102.325,59.4 93.25,59.4
GND on Bottom Layer "GND_L02_P000" (solid, remove dead copper, pour order 0): 83.725,83 83.725,43.725 114.325,43.725 114.325,83